# Altium PCB asar_feather.PcbDoc (part 3 of 5)
Units mm, origin at the board's own origin, x right, y up, seen from the top; angles counter-clockwise.
Board outline 50.8 x 22.86 mm, 6 copper layers (Top Layer, L2-GND, L3-SIG, L4-SIG, L5-VCC3V3, Bottom Layer), stack 1.568 mm thick; 181 components, 156 nets, 840 pads, 1779 vias.
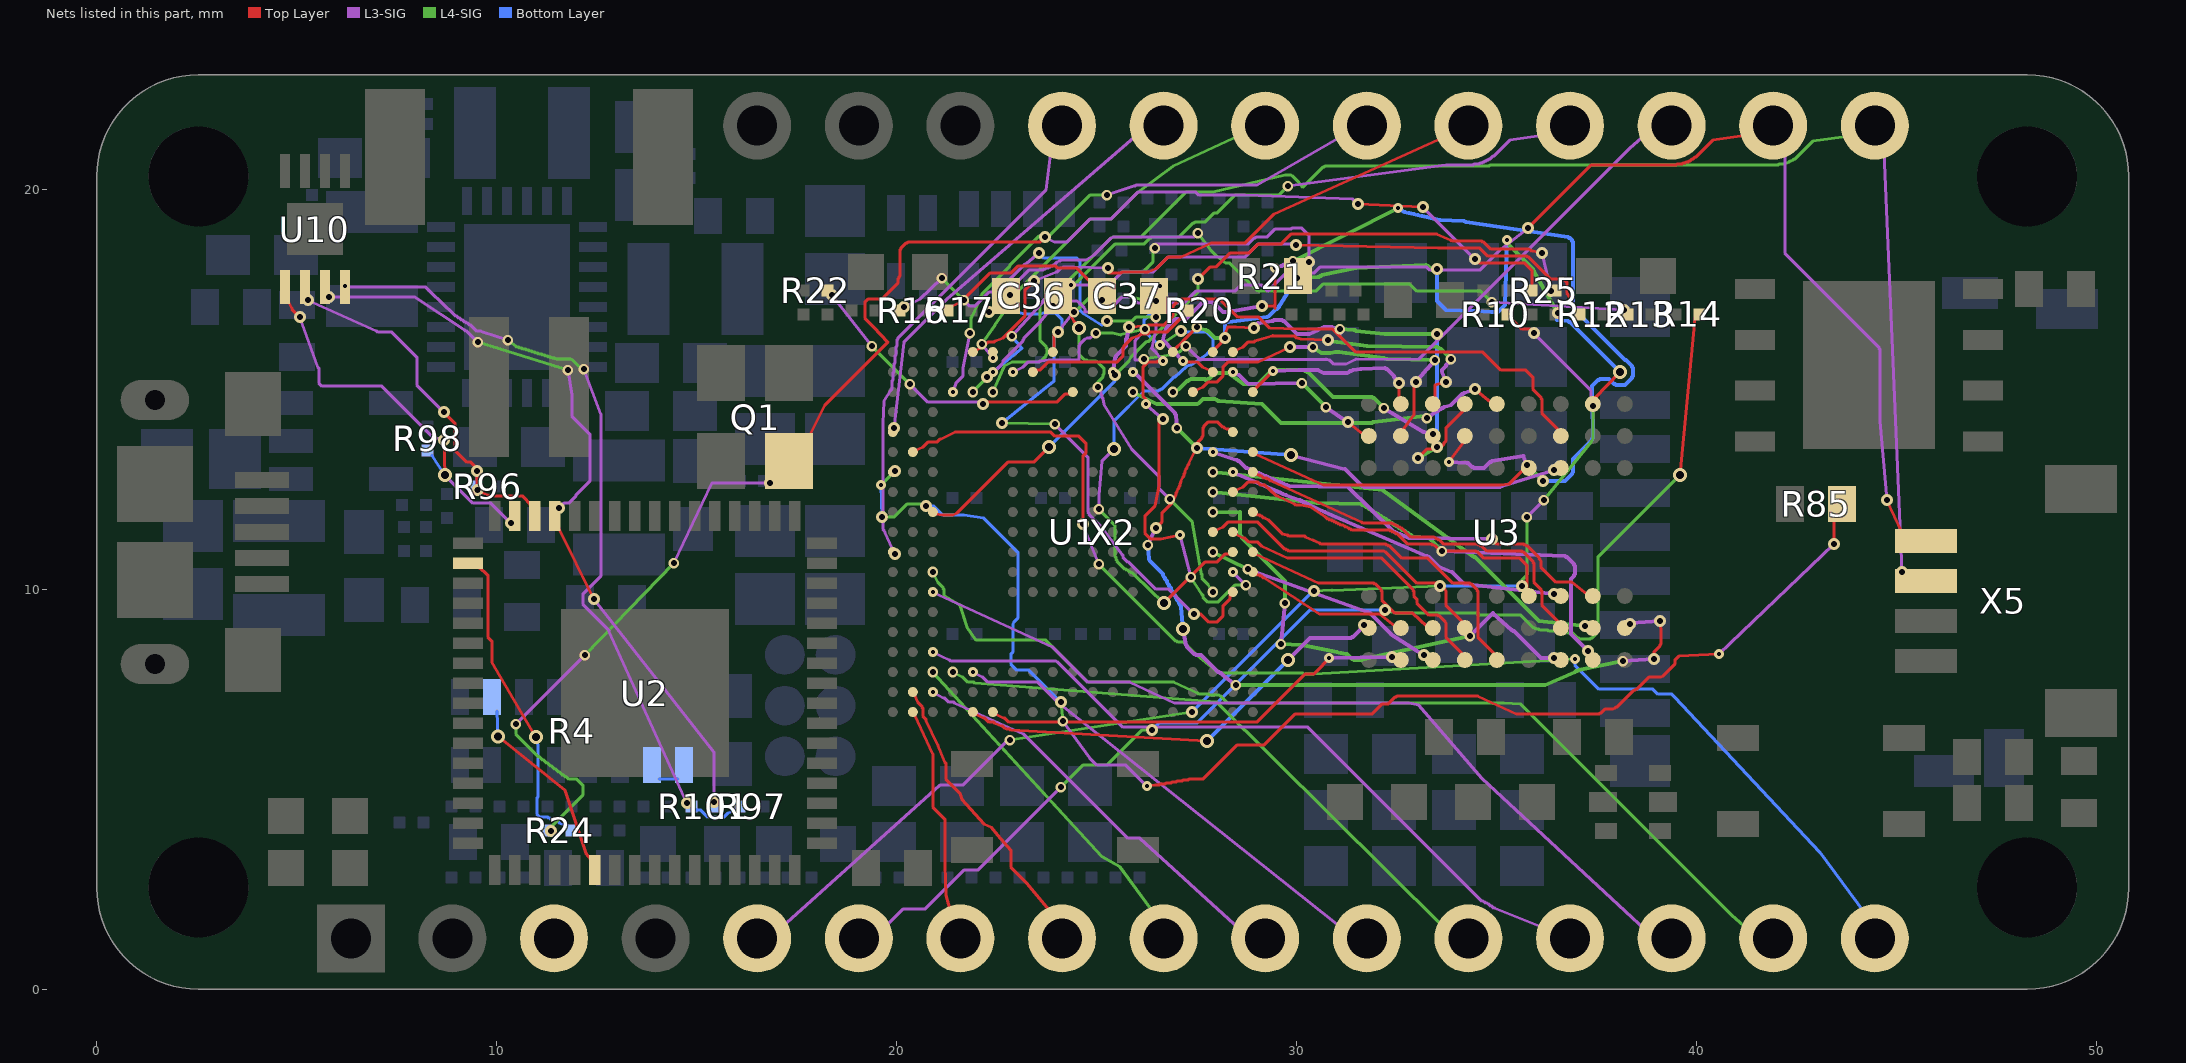
[diagram p6: the nets of this part, all layers, seen from the top]

## Via types
v1: diameter 0.27, hole 0.15, L3-SIG to L4-SIG, tented both sides, 307 vias
v2: diameter 0.3, hole 0.15, L5-VCC3V3 to Bottom Layer, tented both sides, 286 vias
v3: diameter 0.3, hole 0.15, L4-SIG to L5-VCC3V3, tented both sides, 241 vias
v4: diameter 0.3, hole 0.15, Top Layer to L2-GND, tented both sides, 219 vias
v5: diameter 0.3, hole 0.15, L2-GND to L3-SIG, tented both sides, 201 vias
v6: diameter 0.25, hole 0.1, Top Layer to L2-GND, tented both sides, 177 vias
v7: diameter 0.25, hole 0.1, L2-GND to L3-SIG, tented both sides, 125 vias
v8: diameter 0.35, hole 0.2, Top Layer to Bottom Layer, tented both sides, 109 vias
v9: diameter 0.25, hole 0.1, L4-SIG to L5-VCC3V3, tented both sides, 64 vias
v10: diameter 0.25, hole 0.1, L5-VCC3V3 to Bottom Layer, tented both sides, 46 vias
v11: diameter 0.3, hole 0.15, L3-SIG to L4-SIG, tented both sides, 4 vias

## Nets (pads, with @x,y where several pads share a name; then routed paths per layer and width w, separated by ;. In a path a pad name is that pad's centre, name@x,y a point inside that pad or via, vN(x,y) a via of type N, cw(c..) or ccw(c..) an arc to the next point about the centre after c; other vN are vias at no path point) (continued)
A5: U1.R2 U3.J2 | length 21.1
  Top Layer w0.076: v4(26.475,11.525) 26.625,11.675 26.625,11.9 26.875,12.15 26.875,12.175 26.9,12.2 26.9,12.225 26.925,12.25 26.925,12.275 26.95,12.3 26.95,12.325 26.975,12.35 26.975,12.4 27,12.425 27,12.45 27.025,12.5 27.05,12.525 27.05,12.55 27.065,12.581 ; 27.075,12.575 27.075,12.625 27.1,12.7 27.15,12.8 27.175,12.825 27.175,12.875 27.2,12.9 27.2,12.95 27.225,13 27.25,13.025 27.25,13.05 27.275,13.1 27.3,13.125 27.3,13.15 27.35,13.25 27.45,13.45 27.475,13.475 27.475,13.5 ; 27.475,13.499 27.475,13.575 27.5,13.6 27.5,13.625 27.525,13.65 27.525,13.675 27.625,13.775 27.625,13.8 27.65,13.825 27.65,14.025 27.675,14.05 27.675,14.075 27.775,14.175 28.025,14.175 28.15,14.05 28.175,14.05 28.2,14.025 28.25,14 28.3,14 U1.R2@28.325,13.975 ; v4(38.925,8.25) 38.925,8.425 39.075,8.575 39.075,8.6 39.1,8.625 39.1,8.975 v4(39.075,9.2)
  L3-SIG w0.1: v9(26.275,11.1) v4(26.475,11.525) ; v8(27.15,9) 27.225,8.6 27.25,8.575 27.25,8.55 27.425,8.375 27.45,8.375 27.475,8.35 27.6,8.35 28.025,7.925 28.05,7.925 28.075,7.9 28.1,7.9 28.125,7.875 v1(28.475,7.6) ; v1(38.15,8.2) v4(38.925,8.25) ; v4(38.325,9.125) 38.35,9.15 v4(39.075,9.2)
  L4-SIG w0.1: v1(28.475,7.6) 36.2,7.6 36.95,7.925 36.975,7.95 37,7.95 37.05,7.975 v1(38.15,8.2)
  Bottom Layer w0.1: v9(26.275,11.1) 26.3,10.75 26.325,10.7 26.65,10.375 26.65,10.35 26.675,10.3 26.7,10.275 26.7,10.25 26.75,10.2 26.75,10.175 26.775,10.125 26.8,10.1 26.8,10.075 26.85,10.025 26.85,10 26.875,9.95 26.9,9.925 26.9,9.9 26.95,9.85 26.95,9.825 26.975,9.8 26.975,9.775 27,9.75 27,9.725 27.05,9.675 27.05,9.65 27.075,9.6 27.1,9.575 27.1,9.55 v8(27.15,9)
  other v1: 26.275,11.1
  other v5: 38.925,8.25 38.325,9.125 39.075,9.2 26.475,11.525
  other v10: 26.275,11.1
A6: U1.P3 U3.H3 | length 10.8
  Top Layer w0.076: v4(34.875,11.25) 35,11.125 35.675,11.125 35.7,11.1 35.725,11.1 35.75,11.075 35.775,11.075 36.05,10.8 36.05,10.775 36.075,10.75 36.1,10.7 36.1,10.55 36.475,10.175 36.875,10.175 U3.H3@37.25,9.875
  L3-SIG w0.1: v7@27.9,13.425 28.5,13.225 28.525,13.2 28.55,13.2 28.725,13.025 28.75,13.025 28.825,13 28.85,12.975 28.875,12.975 28.9,12.95 28.925,12.95 28.95,12.925 28.975,12.925 29,12.9 29.05,12.9 29.075,12.875 29.1,12.875 29.125,12.85 29.15,12.85 29.225,12.825 29.25,12.8 29.275,12.8 29.3,12.775 29.325,12.775 29.35,12.75 29.4,12.75 29.45,12.725 29.5,12.7 29.575,12.675 29.6,12.65 29.625,12.65 29.65,12.625 29.675,12.625 29.7,12.6 29.75,12.6 29.8,12.575 31.275,12.55 32.4,11.45 32.45,11.425 32.475,11.4 32.5,11.4 32.575,11.375 32.6,11.35 32.625,11.35 32.65,11.325 32.675,11.325 32.75,11.3 32.8,11.275 v4(34.875,11.25)
  other v5: 34.875,11.25
  other v6: 27.9,13.43
  other v7: 27.9,13.43
A7: U1.N3 U3.H2 | length 10.6
  Top Layer w0.076: v4(37.2,9.075) U3.H2@37.25,9.075
  L4-SIG w0.1: v1@27.9,12.925 32.15,12.475 34.4,10.825 34.425,10.8 34.45,10.8 36.05,9.2 v4(37.2,9.075)
  other v1: 37.2,9.075 27.9,12.93
  other v5: 37.2,9.075
  other v6: 27.9,12.93
  other v7: 27.9,12.93
A8: U1.M3 U3.H1 | length 12.1
  Top Layer w0.076: v4(37.275,8.45) U3.H1@37.35,8.375
  L3-SIG w0.1: v1(33.625,10.95) 36.7,10.825 36.725,10.8 36.75,10.8 36.925,10.625 36.925,10.6 36.95,10.575 36.95,10.375 36.925,10.35 36.925,10.325 36.85,10.25 36.85,8.875 v4(37.275,8.45)
  L4-SIG w0.1: v1@27.9,12.425 30.5,12.15 31.6,12.125 31.625,12.1 31.65,12.1 31.7,12.075 31.725,12.05 31.75,12.05 31.8,12 31.825,12 31.875,11.95 31.9,11.95 31.95,11.9 31.975,11.9 32,11.875 32.025,11.875 32.075,11.825 32.1,11.825 32.15,11.775 32.175,11.775 32.2,11.75 32.225,11.75 32.275,11.7 32.3,11.7 32.35,11.65 32.375,11.65 32.425,11.6 32.45,11.6 32.475,11.575 32.5,11.575 32.55,11.525 32.575,11.525 32.625,11.475 32.65,11.475 32.7,11.45 32.75,11.4 32.775,11.4 32.825,11.35 32.85,11.35 32.9,11.3 32.925,11.3 33.3,11.275 v1(33.625,10.95)
  other v1: 27.9,12.43
  other v5: 37.275,8.45
  other v6: 27.9,12.43
  other v7: 27.9,12.43
A9: U1.N2 U3.G3 | length 8.8
  Top Layer w0.076: v4(36.425,9.875) U3.G3@36.45,9.875
  L3-SIG w0.1: v7@28.4,12.925 29.606,12.403 ; 29.6,12.4 29.65,12.375 29.725,12.35 30.075,12.225 30.1,12.2 30.125,12.2 30.15,12.175 30.175,12.175 30.2,12.15 30.225,12.15 30.25,12.125 30.275,12.125 30.7,11.925 ; 30.709,11.925 33.25,10.825 33.275,10.8 33.3,10.8 33.525,10.575 33.875,10.425 34.15,10.15 34.2,10.125 v4(36.425,9.875)
  other v5: 36.425,9.875
  other v6: 28.4,12.93
  other v7: 28.4,12.93
A10: U1.W5 U3.H9 | length 17.6
  Top Layer w0.076: U1.W5@26.95,16 27.143,16.193 ; 27.15,16.2 v1(27.5,16.55) ; U3.H9@37.45,14.775 v8(38.075,15.425)
  L4-SIG w0.1: v1(27.5,16.55) 27.725,16.475 27.75,16.45 27.775,16.45 27.95,16.275 v3(28.2,16.275) ; v3(30,17.775) 30.525,17.8 30.55,17.8 30.575,17.825 30.6,17.825 30.625,17.85 31.475,18.025 33.225,18.1 33.25,18.075 33.275,18.075 33.35,18 v3(33.5,18) ; v9(35.25,18.725) 35.25,18.65 35.9,18 35.9,17.975 35.925,17.95 v3(36.525,16.9)
  Bottom Layer w0.1: v3(28.2,16.275) 28.2,16.675 ; 28.2,16.671 29.25,16.8 29.3,16.825 29.475,17 29.5,17 29.55,17.05 29.55,17.075 29.575,17.1 v3(30,17.775) ; v3(33.5,18) 33.5,17.2 33.725,16.975 34.45,16.95 34.872,16.929 ; 34.875,16.925 35.025,16.925 35.2,17.1 v9(35.25,18.725) ; 36.508,16.726 36.775,16.7 36.8,16.675 36.825,16.675 v8(38.075,15.425) ; 36.525,16.725 v3(36.525,16.9)
  other v2: 28.2,16.275 36.525,16.9 30,17.775 33.5,18
  other v6: 27.5,16.55
  other v7: 27.5,16.55
  other v10: 35.25,18.725
A11: U1.N1 U3.G2 | length 9.4
  Top Layer w0.076: U1.N1@28.975,12.875 29,12.875 29.025,12.85 29.075,12.85 29.1,12.825 29.125,12.825 29.175,12.775 29.25,12.775 29.275,12.75 29.3,12.75 29.35,12.7 29.375,12.7 31.625,11.675 31.65,11.65 32.375,11.65 32.4,11.625 32.425,11.625 32.45,11.6 32.475,11.6 32.5,11.575 32.525,11.575 32.55,11.55 32.575,11.55 32.6,11.525 32.625,11.525 32.85,11.3 33.425,11.3 33.475,11.275 33.5,11.25 33.525,11.25 33.55,11.225 33.575,11.225 33.675,11.125 34.525,11.125 34.55,11.1 34.575,11.1 34.6,11.075 34.625,11.075 34.75,10.95 35.625,10.95 35.65,10.925 35.675,10.925 35.9,10.7 35.9,10.675 35.925,10.65 35.925,10.175 36.1,10 36.1,9.975 36.125,9.95 36.125,9.6 U3.G2@36.55,9.175
A12: U1.L3 U3.G1 | length 12.1
  Top Layer w0.076: v4(36.425,8.275) U3.G1@36.45,8.275
  L3-SIG w0.1: v1(29.6,8.625) v1(29.7,9.65) ; v1(34.325,8.825) 34.9,9.4 35.375,8.975 35.4,8.95 35.425,8.95 36.1,8.275 v4(36.425,8.275)
  L4-SIG w0.1: v1@27.9,11.925 28.575,11.92 ; 28.575,11.925 28.575,11.4 28.6,11.325 28.625,11.3 28.625,11.275 29.7,10.2 v1(29.7,9.65) ; v1(29.6,8.625) 30.125,8.6 30.25,8.575 30.375,8.55 30.5,8.525 30.625,8.5 30.75,8.475 30.875,8.45 31,8.425 31.1,8.4 31.225,8.375 31.25,8.375 31.375,8.25 31.4,8.25 31.425,8.225 31.625,8.225 31.65,8.25 31.675,8.25 v1(34.325,8.825)
  other v1: 27.9,11.93
  other v5: 36.425,8.275
  other v6: 27.9,11.93
  other v7: 27.9,11.93
AIN15_N: C36.1 R13.1 U1.G2 | length 32
  Top Layer w0.076: v4(27.425,9.375) 27.6,9.375 27.8,9.175 28,9.175 28.15,9.325 28.15,9.575 28.325,9.75 28.325,9.825 U1.G2@28.35,9.85
  L3-SIG w0.076: v3(22.3,16.925) 23.15,17.825 23.3,17.975 23.65,17.975 23.675,18 23.7,18 23.725,18.025 23.775,18.025 23.8,18.05 23.825,18.05 23.85,18.075 23.875,18.075 23.9,18.1 23.925,18.1 24,18.175 24.05,18.2 24.075,18.2 24.1,18.225 24.725,18.225 24.925,18.35 24.975,18.4 ; v1(23.95,14.125) 24.775,13.3 24.775,11.925 24.8,11.9 24.8,11.875 25.075,11.6 25.625,10.875 25.65,10.85 25.65,10.8 25.775,10.675 25.8,10.675 26.475,10 26.8,10 v4(27.425,9.375) ; 24.97,18.395 25.35,18.775 25.4,18.8 27.425,18.8 v1(27.525,18.9) ; v1(34.875,17.175) v4(38.175,16.975)
  L4-SIG w0.076: v3(22.625,14.15) v1(23.95,14.125) ; v1(27.525,18.9) 27.85,18.475 28,18.325 28.225,18.15 28.325,18.15 29.025,17.45 30.475,17.45 30.65,17.625 32.825,17.625 33,17.45 34.6,17.45 v1(34.875,17.175)
  Bottom Layer w0.076: v3(22.3,16.925) 23,16.925 23.2,16.875 23.61,16.875 ; v3(22.625,14.15) 23.925,15.2 ; 23.6,16.875 23.65,16.9 23.975,16.9 24.125,16.75 24.125,16.5 23.925,16.3 23.925,16 ; 23.925,15.191 23.925,16.007
  other v1: 22.3,16.925
  other v2: 22.625,14.15 22.3,16.925
  other v4: 22.825,17.35
  other v5: 27.425,9.375 38.175,16.975 22.825,17.35
AIN15_P: C36.2 R12.1 U1.G3 | length 22.6
  Top Layer w0.076: C36.2@24.3,16.975 24.425,16.7 24.575,16.55 v8(24.55,16.525) ; C36.2@24.3,17.6 v6(24.35,17.6) ; v4(29.975,18.6) 33.525,18.525 34.575,18.525 34.775,18.325 35.75,18.325 35.775,18.3 35.8,18.3 36.35,17.75 36.675,17.75 36.75,17.675 36.75,17.4 36.775,17.375 R12.1@36.95,16.975
  L3-SIG w0.076: v6(24.35,17.6) 25.3,17.6 25.625,17.925 26.4,17.925 26.775,18.3 28.7,18.3 29.025,18.625 29.95,18.625 v4(29.975,18.6) ; v1(25.025,15.05) 25.1,14.975 25.1,14.875 25.125,14.85 25.125,14.8 25.15,14.775 25.15,14.75 25.175,14.625 25.875,13.5 26.55,12.825 26.55,12.525 v1(26.825,12.25)
  L4-SIG w0.076: v8(24.55,16.525) 24.55,15.875 24.7,15.725 24.75,15.725 24.775,15.7 24.975,15.7 25.025,15.675 25.175,15.525 ; v1(25.025,15.05) 25.025,15.175 25.15,15.3 25.15,15.35 25.175,15.375 25.175,15.52 ; v1(26.825,12.25) 27.375,11.7 27.6,10.425 27.6,10.4 27.625,10.375 27.625,10.275 27.775,10.125 v1@27.9,9.925
  other v1: 27.9,9.93
  other v5: 29.975,18.6
  other v6: 27.9,9.93
  other v7: 27.9,9.93 24.35,17.6
AIN16_N: C37.1 R17.1 U1.J2 | length 20.3
  Top Layer w0.076: R17.1@21.375,17.075 21.6,17.175 22.325,17.9 22.85,17.9 23.025,18.075 23.975,18.075 24.025,18.025 24.5,18.025 C37.1@24.85,17.675 ; v8(26.675,9.65) 27.7,10.675 28,10.675 28.2,10.875 U1.J2@28.325,10.875
  L3-SIG w0.076: v1(25.05,12) 25.05,12.35 25.125,13.2 v8(25.425,13.5)
  L4-SIG w0.076: v1(25.05,12) 25.45,11.6 25.45,10.825 25.475,10.8 25.475,10.75 25.5,10.725 25.5,10.7 25.7,10.5 25.725,10.5 25.75,10.475 25.775,10.475 25.825,10.425 25.85,10.425 25.875,10.4 25.9,10.4 25.95,10.35 v8(26.675,9.65) ; v1(25.125,17.225) 25.317,17.017 ; 25.325,17.025 25.6,17.3 25.875,17.3 26.275,17.2 ; 26.287,17.19 v9(26.575,17.575) ; v9(26.575,16.1) v3(27.1,16.45)
  Bottom Layer w0.076: v8(25.425,13.5) 25.425,14.2 26.182,14.957 ; 26.175,14.95 26.525,14.95 26.55,14.975 26.575,14.975 26.6,15 26.625,15 26.925,15.3 26.95,15.3 27.25,15.575 27.35,15.6 27.75,15.875 27.9,16.025 27.9,16.275 27.75,16.425 27.125,16.425 v3(27.1,16.45) ; v10@26.575,16.075 v9(26.575,16.1) ; v9(26.575,17.575) 26.55,17.55 26.55,17.075 26.475,17 26.45,17 26.175,16.725 26.175,16.55 26.175,16.475 v10@26.603,16.047
  other v2: 27.1,16.45
  other v4: 25.125,17.225
  other v5: 25.125,17.225
  other v10: 26.575,16.1 26.575,17.575
AIN16_P: C37.2 R16.1 U1.H2 | length 20
  Top Layer w0.076: 26.15,15.3 26.15,15.55 26.275,15.675 26.5,15.675 26.525,15.7 v6(26.65,15.7) ; 26.15,15.303 26.15,14.825 26.225,14.75 v6(26.225,14.625) ; v4(26.65,14.25) 26.55,14.15 26.55,12.575 26.45,12.075 26.2,11.825 26.2,11.4 26.35,11.25 26.6,11.25 v6(27.075,11.35)
  L3-SIG w0.076: v4(20.175,17.05) 20.575,17.25 v1(21.125,17.775) ; v1(21.675,17.225) 21.825,17.075 21.94,17.075 ; 21.95,17.075 22.3,17.425 22.5,17.425 23.2,18.125 23.25,18.15 v3(23.55,18.4) ; v6(26.225,14.625) v4(26.65,14.25) ; 26.365,16.035 26.45,15.95 v6(26.65,15.7) ; 26.375,16.025 26.45,16.375 26.45,16.4 26.475,16.425 v1(26.475,16.8) v4(26.475,17.2) ; v6(27.075,11.35) v1(27.35,10.3) ; v7@28.4,10.425 v1(28.725,10.1)
  L4-SIG w0.076: v1(21.125,17.775) v1(21.675,17.225) ; v3(25.25,16.7) 25.6,16.7 25.875,16.7 25.975,16.8 v1(26.475,16.8) ; v1(27.35,10.3) 27.625,9.875 27.65,9.85 27.65,9.8 27.775,9.675 28.025,9.675 28.45,10.1 v1(28.725,10.1)
  Bottom Layer w0.076: v3(23.55,18.4) 23.675,18.275 24.5,18.275 24.575,18.2 24.575,16.975 24.654,16.896 ; 24.65,16.9 25.125,16.6 25.225,16.675 v3(25.25,16.7)
  other v1: 23.55,18.4
  other v2: 25.25,16.7 23.55,18.4
  other v5: 26.65,14.25 20.175,17.05 26.475,17.2
  other v6: 28.4,10.43
  other v7: 28.4,10.43 27.075,11.35 26.225,14.625 26.65,15.7
ANALOG-IO0: R10.2 X2.5 | length 29.9
  Top Layer w0.076: R10.2@35.375,16.775 35.4,16.725 35.625,16.5 35.825,16.5 v4(35.925,16.4)
  L3-SIG w0.076: X2.5@17.125,1.55 21.075,5.1 21.65,5.1 22.775,6.225 v1(22.825,6.225) ; v1(35.75,11.8) v1(36.175,12.225) ; v4(35.925,16.4) 37.325,15 37.35,14.95 37.35,14.625 v1(37.4,14.575)
  L4-SIG w0.076: v1(22.825,6.225) v3(27.375,6.925) ; v3(30.425,9.95) 30.875,9.975 ; 30.877,9.969 v3(33.575,10.075) ; v3(35.625,10.075) 35.625,10.225 35.75,10.35 v1(35.75,11.8) ; v1(36.175,12.225) 37.375,13.7 37.4,13.75 v1(37.4,14.575)
  Bottom Layer w0.076: v3(27.375,6.925) 30.4,9.95 v3(30.425,9.95) ; v3(33.575,10.075) v3(35.625,10.075)
  other v2: 27.375,6.925 30.425,9.95 33.575,10.075 35.625,10.075
  other v5: 35.925,16.4
ANALOG-IO1: R14.2 X2.6 | length 30.2
  Top Layer w0.076: v8(39.575,12.85) R14.2@39.95,16.775
  L3-SIG w0.076: X2.6@19.675,1.525 20.15,2 20.7,2 21.675,2.975 22.025,2.975 v1(24.1,5.05)
  L4-SIG w0.076: v1(24.1,5.05) 24.65,5.6 25.25,5.6 26.125,6.475 v3(26.375,6.475) ; v3(32.2,9.475) 32.45,9.4 34.5,9.4 34.525,9.375 34.55,9.375 34.575,9.35 35.6,9.35 35.925,9.025 35.95,9.025 35.975,9 36.05,9 36.075,8.975 36.275,8.975 36.3,8.95 36.5,8.95 36.525,8.925 36.75,8.925 36.775,8.9 36.9,8.9 37.025,8.775 37.05,8.775 37.075,8.75 37.325,8.75 37.35,8.775 37.375,8.775 37.5,8.9 37.5,8.925 37.525,8.95 37.525,10.8 v8(39.575,12.85)
  Bottom Layer w0.076: v3(26.375,6.475) 26.55,6.65 27.5,6.65 30.325,9.475 v3(32.2,9.475)
  other v2: 26.375,6.475 32.2,9.475
AREF: X2.3
BS0: U1.V7 U3.G7 | length 11.8
  Top Layer w0.076: v4(36.425,12.975) U3.G7@36.45,12.975
  L3-SIG w0.1: v7@25.9,15.425 25.975,15.375 26.95,14.4 26.95,14.375 26.975,14.35 v1(27,14.025) ; v8(29.85,13.35) 31.2,13 31.625,12.575 31.65,12.575 31.675,12.55 35.075,12.55 35.1,12.575 35.125,12.575 v4(36.425,12.975)
  L4-SIG w0.1: v1(27,14.025) v3(27.5,13.525)
  Bottom Layer w0.1: v3(27.5,13.525) v8(29.85,13.35)
  other v2: 27.5,13.525
  other v5: 36.425,12.975
  other v6: 25.9,15.43
  other v7: 25.9,15.43
BS1: U1.V8 U3.G8 | length 14.2
  Top Layer w0.076: v4(25.8,16.55) 26.225,16.575 26.25,16.575 26.275,16.6 26.675,16.6 ; 26.67,16.595 26.9,16.825 26.9,17.075 27.075,17.25 28.075,17.25 28.525,16.8 29.05,16.8 29.325,16.525 30.025,16.5 30.9,16.5 31.475,15.925 34.65,15.925 35.1,15.475 35.725,15.475 35.9,15.3 35.9,15 36.1,14.8 36.1,14.775 36.125,14.75 36.125,14.4 U3.G8@36.55,13.975
  L3-SIG w0.1: v7@25.4,15.425 25.45,15.775 25.475,15.8 25.475,15.825 25.725,16.075 25.725,16.25 25.75,16.275 25.75,16.3 v4(25.8,16.55)
  other v5: 25.8,16.55
  other v6: 25.4,15.43
  other v7: 25.4,15.43
BTN: R85.2 U1.N19 | length 33.8
  Top Layer w0.076: v6(26.25,5.075) 26.45,5.1 26.55,5.1 26.575,5.125 26.7,5.125 26.725,5.15 26.85,5.15 26.875,5.175 26.975,5.175 27,5.2 27.125,5.2 27.15,5.225 27.275,5.225 27.3,5.25 27.65,5.25 28.5,6.1 29.175,6.1 29.95,6.875 31.875,6.875 32.125,7.125 32.275,7.125 32.45,7.3 32.475,7.3 32.5,7.325 34.525,7.325 35.5,6.875 37.55,6.875 37.575,6.9 37.6,6.9 37.7,7 37.9,7 37.95,7.025 37.975,7.05 38,7.05 38.425,7.475 38.45,7.475 38.475,7.5 38.5,7.5 38.8,7.8 39.1,7.8 39.15,7.825 39.45,8.125 39.45,8.225 39.55,8.325 v6(40.55,8.375) ; v4(43.425,11.125) R85.2@43.425,11.775
  L3-SIG w0.076: v1(24.15,6.7) 24.825,5.775 25,5.6 25.725,5.6 v6(26.25,5.075) ; v6(40.55,8.375) v4(43.425,11.125)
  L4-SIG w0.076: v9(19.6,12.6) v4(19.95,12.95) ; v3(19.625,11.8) 19.925,11.8 20.25,12.125 20.675,12.125 v3(20.725,12.075) ; v3(24.1,7.175) v1(24.15,6.7)
  Bottom Layer w0.076: v9(19.6,12.6) v3(19.625,11.8) ; v3(20.725,12.075) 20.925,12.075 21.15,11.85 21.675,11.85 22.175,11.775 23.025,10.925 23.025,9.275 22.925,9.175 22.9,9.125 22.9,8.425 22.85,8.375 22.85,8.125 23,7.975 23.3,7.975 v3(24.1,7.175)
  other v1: 19.95,12.95
  other v2: 24.1,7.175 19.625,11.8 20.725,12.075
  other v5: 43.425,11.125 19.95,12.95
  other v7: 26.25,5.075 40.55,8.375
  other v10: 19.6,12.6
CAS#: U1.P1 U3.F7 | length 7
  Top Layer w0.076: U1.P1@28.975,13.375 30.675,12.6 35.1,12.6 35.3,12.625 U3.F7@35.65,12.975
CFG-M0: R20.1 U1.V12 | length 4.4
  Top Layer w0.076: U1.V12@23.475,15.475 23.575,15.475 23.775,15.675 25.5,15.675 25.65,15.825 25.65,16.025 25.675,16.05 25.675,16.075 25.875,16.275 26.075,16.35 26.1,16.375 26.275,16.375 26.325,16.425 26.75,16.425 27.15,16.825 R20.1@27.15,16.85
CFG-M1: R21.2 U1.W11 | length 8.8
  Top Layer w0.076: U1.W11@23.925,16.025 23.925,16.375 v4(24.025,16.425)
  L3-SIG w0.076: v4(24.025,16.425) v1(24.425,16.925) ; v1(26.45,18.525) 26.45,18.625 28.775,18.625 28.925,18.775 28.95,18.775 28.975,18.8 29.25,18.8 29.45,19 29.85,19 29.875,19.025 30.125,19.025 30.3,18.85 v4(30.3,18.175)
  L4-SIG w0.076: v1(24.425,16.925) v1@24.5,16.975 ; v1@24.51,16.985 25,17.475 25.05,17.5 25.2,17.5 25.625,17.925 26.15,17.925 26.4,18.175 26.4,18.475 v1(26.45,18.525)
  other v5: 24.025,16.425 30.3,18.175
CFG-M2: R22.2 U1.U10 | length 7.3
  Top Layer w0.076: v4(22.15,14.625) 22.2,14.675 24,14.675 24.2,14.875 U1.U10@24.325,14.875
  L3-SIG w0.076: v4(18.375,17.35) v1(19.375,16.075) ; v1(20.325,15.125) 20.775,14.675 22.1,14.675 v4(22.15,14.625)
  L4-SIG w0.076: v1(19.375,16.075) v1(20.325,15.125)
  other v5: 22.15,14.625 18.375,17.35
CHAN0: U1.A18 X2.7 | length 5.2
  Top Layer w0.076: U1.A18@20.45,6.85 20.9,5.875 20.9,4.55 21.2,4.25 21.2,3.1 21.225,2.35 X2.7@21.35,1.9
CHAN1: U1.B18 X2.8 | length 6.7
  Top Layer w0.076: U1.B18@20.45,7.35 20.525,7.175 20.625,7.075 20.625,7.05 20.65,7.025 20.65,6.825 20.725,6.75 20.725,6.725 21.025,6.1 21.2,5.675 21.225,5.65 21.225,5.25 21.575,4.9 21.625,4.75 22.187,4.125 22.363,4.048 22.525,3.85 22.85,3.475 22.85,3.05 23.25,2.65 X2.8@23.875,1.9
CHAN2: U1.C17 X2.9 | length 8.2
  L4-SIG w0.076: v1@20.9,7.925 25.124,3.319 25.58,3.058 X2.9@26.425,1.9
  other v1: 20.9,7.93
  other v6: 20.9,7.93
  other v7: 20.9,7.93
CHAN3: U1.B17 X2.10 | length 9.9
  L3-SIG w0.076: v7@20.9,7.425 21.175,7.275 21.2,7.275 21.3,7.175 21.425,7.175 21.45,7.15 23.175,6.375 25.775,3.775 26.075,3.775 X2.10@28.575,1.5
  other v6: 20.9,7.43
  other v7: 20.9,7.43
CHAN4: U1.C15 X2.11 | length 11.5
  L3-SIG w0.076: v7@21.9,7.925 22.15,7.8 22.275,7.675 23.525,7.675 24.05,7.15 X2.11@31.125,1.525
  other v6: 21.9,7.93
  other v7: 21.9,7.93
CHAN5: U1.C16 X2.12 | length 14.7
  L4-SIG w0.076: v1@21.4,7.925 21.65,7.8 21.775,7.675 21.925,7.675 21.95,7.65 28,7.175 X2.12@33.675,1.55
  other v1: 21.4,7.93
  other v6: 21.4,7.93
  other v7: 21.4,7.93
CHAN6: U1.D17 X2.13 | length 18
  L3-SIG w0.076: v7@20.9,8.425 21.325,8.225 21.35,8.2 23.975,8.2 24.025,8.175 25.65,6.55 30.275,6.55 34.625,2.2 34.65,2.2 34.7,2.175 34.725,2.15 34.75,2.15 34.8,2.125 34.85,2.075 34.875,2.075 34.925,2.025 34.95,2.025 X2.13@36.2,1.525
  other v6: 20.9,8.43
  other v7: 20.9,8.43
CHAN7: U1.G17 X2.14 | length 20.9
  L3-SIG w0.076: v7@20.9,9.925 23.9,8.55 24.775,7.675 25.825,7.675 26.95,7.15 32.8,7.15 33.05,7.1 34.625,5.275 X2.14@38.725,1.475
  other v6: 20.9,9.93
  other v7: 20.9,9.93
CHAN8: U1.H17 X2.15 | length 24.3
  L4-SIG w0.076: v1@20.9,10.425 21.025,10.175 21.15,10.05 21.15,10.025 21.175,10 21.175,9.85 21.575,9.6 21.75,9.055 21.975,8.725 23.725,8.725 24.775,7.675 26.925,7.675 27.525,7.4 27.55,7.375 27.8,7.375 27.825,7.35 28.05,7.35 28.1,7.325 28.275,7.15 35.175,7.15 35.6,7.125 40.875,1.85 X2.15@41.275,1.5
  other v1: 20.9,10.43
  other v6: 20.9,10.43
  other v7: 20.9,10.43
CHAN14: U1.J19 X2.20 | length 11.8
  L3-SIG w0.076: v4(19.95,10.875) 19.7,11.425 19.675,11.475 19.65,11.5 19.65,14.15 19.675,14.7 19.85,14.975 19.875,15 19.875,15.2 19.9,15.225 19.9,15.4 19.925,15.425 19.925,15.625 19.95,15.65 19.95,15.825 19.975,15.85 19.975,16.05 20,16.075 20,16.225 20.025,16.25 20.025,16.275 23.725,19.975 X2.20@23.85,20.975
  other v5: 19.95,10.875
CHAN15: U1.R19 X2.21 | length 10
  L3-SIG w0.076: v4(19.925,14.025) 20.175,16.175 21.25,17.25 X2.21@26.025,21.375
  other v5: 19.925,14.025
CHAN16: U1.W14 X2.22 | length 9.1
  Top Layer w0.076: v6(22.4,15.775) U1.W14@22.4,15.85
  L3-SIG w0.076: v1(22.125,16.125) v6(22.4,15.775)
  L4-SIG w0.076: v1(22.125,16.125) 22.455,16.598 ; 22.45,16.6 22.875,17.2 ; 22.869,17.194 23.1,17.525 24.825,19.25 25.35,19.25 26.025,19.925 26.9,20.575 X2.22@28.575,21.35
  other v7: 22.4,15.775
CHAN17: U1.U16 X2.23 | length 13.1
  L3-SIG w0.076: v7@21.4,14.925 21.475,15.15 21.65,15.325 21.65,15.525 v1(21.825,16.4) ; v1(25.25,19.85) 25.925,20.075 25.95,20.075 25.975,20.1 29,20.1 X2.23@31.125,21.325
  L4-SIG w0.076: v1(21.825,16.4) 21.85,16.425 21.85,16.775 21.875,16.8 21.875,16.825 21.903,16.853 ; 21.9,16.85 22,17.075 22.1,17.25 ; 22.1,17.246 22.1,17.325 22.125,17.35 22.125,17.375 22.825,18.075 22.825,18.1 23.55,18.825 23.575,18.825 23.6,18.85 23.825,18.85 24.825,19.85 v1(25.25,19.85)
  other v6: 21.4,14.93
  other v7: 21.4,14.93
CHAN18: U1.W15 X2.24 | length 13.9
  Top Layer w0.076: U1.W15@21.975,15.975 22.15,16.05 22.275,16.175 22.425,16.175 22.45,16.2 22.65,16.275 23.2,16.825 23.2,17.475 v4(23.425,17.7) ; v4(25.275,18.025) 25.275,17.9 25.6,17.9 25.625,17.925 26.275,17.925 26.5,18.025 26.775,18.3 27.1,18.3 27.85,18.65 28.7,18.65 29.425,19.375 X2.24@33.675,21.3
  L3-SIG w0.076: v4(23.425,17.7) 23.975,17.925 24,17.925 24.1,18.025 24.15,18.05 24.425,18.05 v4(25.275,18.025)
  other v5: 23.425,17.7 25.275,18.025
CHAN19: U1.V14 X2.25 | length 16.1
  L3-SIG w0.076: v7@22.4,15.425 22.475,15.475 22.625,15.625 22.65,15.675 22.65,15.7 23.15,16.2 23.15,16.225 23.175,16.25 23.175,16.275 23.575,16.675 v1(23.9,17.075) ; v1(29.775,20.075) 33.725,20.6 34.4,20.6 34.425,20.625 34.55,20.625 34.575,20.65 34.625,20.65 34.65,20.675 34.675,20.675 34.7,20.7 34.725,20.7 34.75,20.725 34.775,20.725 34.8,20.75 34.825,20.75 34.9,20.825 34.925,20.825 35.325,21.225 X2.25@36.2,21.35
  L4-SIG w0.076: v1(23.9,17.075) 25.45,18.625 26.175,18.625 26.325,18.775 26.35,18.775 26.375,18.8 27.05,18.8 27.4,19.15 27.425,19.15 27.45,19.175 27.7,19.175 27.925,19.4 28,19.4 28.45,19.85 29.55,19.85 v1(29.775,20.075)
  other v6: 22.4,15.43
  other v7: 22.4,15.43
CHAN20: U1.V13 X2.26 | length 20.2
  L3-SIG w0.076: v7@22.9,15.425 23.15,15.55 23.272,15.672 ; 23.275,15.675 23.55,15.675 23.575,15.7 23.6,15.7 23.8,15.725 ; 23.791,15.726 24.55,15.728 ; 24.55,15.725 24.55,16.075 24.575,16.1 24.575,16.125 24.7,16.25 24.75,16.275 24.801,16.275 24.825,16.275 24.85,16.3 v1(24.975,16.4) ; 25.95,15.725 25.95,16.206 ; 25.95,15.731 v1@26.106,15.732 ; 25.95,16.2 v1(26.2,16.5) ; v1@26.1,15.725 v1(26.175,15.75) ; v1(27.225,16.075) 27.6,15.725 ; 27.598,15.736 30.732,15.744 ; 30.725,15.75 30.8,15.725 30.825,15.725 30.925,15.625 31.225,15.625 31.475,15.75 ; 31.469,15.746 33.05,15.75 38.325,21.025 X2.26@38.725,21.375
  L4-SIG w0.076: v1(24.975,16.4) 25.4,16.4 25.6,16.35 ; 25.602,16.362 v1(26.2,16.5) ; v1(26.175,15.75) 27,15.875 v1(27.225,16.075)
  other v6: 22.9,15.43
  other v7: 22.9,15.43
CHAN21: U1.U15 X2.27 X5.4 | length 34.2
  Top Layer w0.076: v4(35.775,19.025) 37.35,20.6 39.475,20.6 39.5,20.625 39.625,20.625 39.65,20.65 39.7,20.65 39.725,20.675 39.775,20.675 39.8,20.7 39.825,20.7 39.875,20.75 39.9,20.75 39.95,20.8 39.975,20.8 40.4,21.225 X2.27@41.275,21.35 ; v4(44.75,12.225) X5.4@45.125,11.425
  L3-SIG w0.076: v1(22.875,16.325) 23.625,17.15 23.65,17.175 23.65,17.2 23.775,17.325 23.8,17.325 23.825,17.35 23.975,17.35 24,17.325 24.025,17.325 24.175,17.175 24.3,17.175 24.35,17.2 24.5,17.2 24.55,17.175 24.675,17.05 24.7,17 24.7,16.925 ; 24.699,16.925 25.25,16.925 25.625,17.3 25.875,17.3 26.025,17.15 26.188,17.15 ; 26.2,17.15 26.2,17.325 26.35,17.475 26.6,17.475 26.75,17.325 26.75,17.275 26.775,17.25 26.8,17.15 ; 26.812,17.15 27.175,17.15 27.475,17.45 28.45,17.45 28.6,17.6 29.125,17.6 29.275,17.45 29.725,17.9 30.425,17.9 30.575,18.05 33.25,18.05 33.325,17.975 34.575,17.975 35.1,18.5 v4(35.775,19.025) ; X2.27@42.2,20.975 42.2,18.4 44.55,16.05 44.55,16.025 44.575,16 44.575,14.2 v4(44.75,12.225)
  L4-SIG w0.076: v1@21.9,14.925 v3(22.25,15.3)
  Bottom Layer w0.076: v3(22.25,15.3) 23.129,16.021 ; v1(22.875,16.325) 23.125,16.025
  other v1: 21.9,14.93
  other v2: 22.25,15.3
  other v5: 44.75,12.225 35.775,19.025
  other v6: 21.9,14.93
  other v7: 21.9,14.93
  other v9: 22.875,16.325
  other v10: 22.875,16.325
CHAN22: U1.U14 X2.28 X5.3 | length 35.8
  L3-SIG w0.076: X2.28@44.675,20.95 v4(45.125,10.425)
  L4-SIG w0.076: v1@22.4,14.925 22.678,15.567 ; 22.675,15.575 22.875,15.675 23.55,15.675 23.575,15.7 23.6,15.7 23.725,15.825 23.725,15.85 23.75,15.875 23.75,16.025 23.725,16.05 23.725,16.075 23.575,16.225 23.575,17.125 23.775,17.325 23.8,17.325 23.825,17.35 23.925,17.35 25.35,18.775 25.4,18.8 26.1,18.8 27.225,19.925 27.9,19.925 29.7,20.35 29.85,20.35 29.9,20.325 30.025,20.2 30.15,20.05 30.65,20.55 30.675,20.55 30.7,20.575 34.8,20.575 34.825,20.6 42.025,20.6 42.05,20.625 42.175,20.625 42.2,20.65 42.25,20.65 42.3,20.675 42.325,20.7 42.35,20.7 42.4,20.725 42.425,20.75 42.45,20.75 42.9,21.2 X2.28@43.825,21.325
  other v1: 22.4,14.93
  other v5: 45.125,10.425
  other v6: 22.4,14.93
  other v7: 22.4,14.93
CHAN-CLK: U1.P18 X2.16 | length 30.8
  Top Layer w0.076: U1.P18@20.475,13.475 20.65,13.55 20.775,13.675 21,13.675 21.075,13.75 21.1,13.75 21.45,13.925 23.85,13.925 23.95,13.825 24.55,13.825 24.725,13.65 24.725,13.4 24.65,13.325 v4(24.65,11.625)
  L3-SIG w0.076: v4(24.65,11.625) v1(25.05,10.625)
  L4-SIG w0.076: v1(25.05,10.625) 26.975,8.7 27,8.7 27.025,8.675 27.175,8.675 27.45,8.4 28,7.95 28.025,7.95 28.05,7.925 28.1,7.9 30.15,7.9 30.175,7.875 30.425,7.875 v9(36.95,8.25)
  Bottom Layer w0.076: v9(36.95,8.25) 36.95,8.1 37.55,7.5 38.9,7.5 39.025,7.375 39.375,7.375 39.45,7.3 43.075,3.425 X2.16@44.2,1.9
  other v5: 24.65,11.625
  other v10: 36.95,8.25
CKE: U1.M2 U3.F3 | length 8.7
  Top Layer w0.076: U1.M2@28.475,12.475 28.65,12.55 28.775,12.675 29.025,12.675 29.1,12.6 29.2,12.6 29.475,12.35 29.5,12.325 29.525,12.325 29.95,12.125 29.975,12.1 30.1,12.1 30.35,12.05 30.725,11.8 ; 30.72,11.79 30.75,11.775 30.775,11.75 30.8,11.75 30.825,11.725 30.875,11.725 30.9,11.7 30.925,11.7 30.95,11.675 30.975,11.675 31,11.65 31.025,11.65 31.05,11.625 31.075,11.625 31.1,11.6 31.15,11.6 31.2,11.575 31.225,11.55 31.25,11.55 31.3,11.525 31.325,11.5 31.35,11.5 31.375,11.475 32.325,11.475 32.35,11.45 32.375,11.45 32.4,11.425 32.425,11.425 32.475,11.4 32.5,11.375 32.525,11.375 32.775,11.125 33.375,11.125 33.4,11.1 33.425,11.1 33.475,11.075 33.6,10.95 34.475,10.95 34.5,10.925 34.525,10.925 34.675,10.775 35.575,10.775 35.75,10.6 U3.F3@35.75,9.975
CLK-12M-FPGA: R25.2 U1.L17 | length 19.5
  Top Layer w0.076: U1.L17@20.975,11.875 21.15,11.85 21.4,11.85 21.5,11.9 22.775,13.175 23.425,13.175 v8(23.8,13.55) ; v1(27.525,17.75) 27.825,18.05 27.975,18.05 28.325,18.4 28.8,18.4 29.025,18.625 29.6,18.625 29.85,18.875 33.5,18.875 33.85,18.725 33.875,18.7 34.625,18.7 34.65,18.675 34.675,18.675 34.85,18.5 35.8,18.5 35.85,18.475 35.875,18.45 35.9,18.45 v4(36.125,18.4)
  L3-SIG w0.076: v4(36.125,18.4) v4(36.35,17.45)
  L4-SIG w0.076: v3(25.45,15.35) 25.81,15.71 ; 25.8,15.7 25.85,15.8 26.225,16.175 26.3,16.2 ; 26.29,16.19 27.525,17.425 v1(27.525,17.75)
  Bottom Layer w0.076: v8(23.8,13.55) 25.45,15.2 v3(25.45,15.35)
  other v2: 25.45,15.35
  other v4: 27.525,17.75
  other v5: 36.35,17.45 27.525,17.75 36.125,18.4
CLK-12M-FT: R24.2 U2.2 | length 7.5
  Top Layer w0.076: U2.2@9.55,10.55 9.7,10.425 9.775,10.35 9.775,8.8 9.875,8.7 9.875,8.175 v8(10.975,6.3)
  Bottom Layer w0.076: v8(10.975,6.3) 11.025,6.1 11.025,4.8 11,4.775 11,4.375 11.075,4.3 11.275,4.3 11.3,4.275 11.325,4.275 11.35,4.25 11.475,4.25 11.575,4.15 R24.2@11.75,4.075
CLK-12M-SHARED: Q1.3 R24.1 R25.1 | length 37.2
  Top Layer w0.076: v4(16.825,12.65) Q1.3@16.85,12.65 ; Q1.3@17.775,13.75 18.2,14.6 19.775,16.175 19.425,16.55 19.2,16.775 19.2,17.175 19.275,17.25 19.625,17.25 20.025,17.65 20.025,17.75 20.05,17.775 20.05,17.8 20.075,17.825 20.075,18.475 20.1,18.5 20.1,18.525 20.225,18.65 20.25,18.65 20.275,18.675 23.575,18.675 v4(23.7,18.8) ; v4(31.525,19.625) v4(33.15,19.55) ; v4(34.45,18.25) 34.55,18.15 35.7,18.15 35.875,17.975 R25.1@35.875,17.575
  L3-SIG w0.076: v1(10.475,6.625) v1(12.2,8.35) ; v1(14.425,10.65) 15.375,12.65 v4(16.825,12.65) ; v4(23.7,18.8) 23.95,18.675 ; 23.941,18.675 24.25,18.675 24.825,19.25 25.35,19.25 26.025,19.925 27.475,19.925 27.55,19.85 28.7,19.85 31.4,19.75 v4(31.525,19.625) ; v4(33.15,19.55) v4(34.45,18.25)
  L4-SIG w0.076: v1(10.475,6.625) 10.475,6.375 11.05,5.8 11.075,5.8 11.15,5.725 11.175,5.725 11.25,5.65 11.275,5.65 11.35,5.575 11.375,5.575 11.45,5.5 11.475,5.5 11.55,5.425 11.575,5.425 11.65,5.35 11.675,5.35 11.725,5.3 11.75,5.3 11.8,5.25 12,5.25 12.15,5.1 12.15,4.85 11.375,4.075 v3(11.35,3.95) ; v1(12.2,8.35) v1(14.425,10.65)
  other v2: 11.35,3.95
  other v5: 16.825,12.65 34.45,18.25 23.7,18.8 33.15,19.55 31.525,19.625
D0: U1.V2 U3.A8 | length 3.8
  Top Layer w0.076: v4(31.275,14.175) U3.A8@31.65,13.875
  L3-SIG w0.1: v7@28.4,15.425 28.55,15.35 28.75,15.15 28.8,15.125 v1(30.125,15.15) ; v1(30.725,14.55) v4(31.275,14.175)
  L4-SIG w0.1: v1(30.125,15.15) v1(30.725,14.55)
  other v5: 31.275,14.175
  other v6: 28.4,15.43
  other v7: 28.4,15.43
D1: U1.U1 U3.B9 | length 4.4
  Top Layer w0.076: U1.U1@28.95,15 v6(29.4,15.45) ; U3.B9@32.55,14.775 v4(32.55,15.15)
  L3-SIG w0.1: v6(29.4,15.45) 30.05,15.475 30.517,15.486 ; 30.525,15.475 30.675,15.4 31.25,15.4 31.3,15.425 31.325,15.45 31.35,15.45 31.4,15.475 31.6,15.5 ; 31.59,15.511 32.2,15.525 32.225,15.5 32.25,15.5 32.425,15.325 32.425,15.3 32.45,15.275 v4(32.55,15.15)
  other v5: 32.55,15.15
  other v7: 29.4,15.45
D2: U1.U4 U3.B8 | length 8.6
  Top Layer w0.076: U1.U4@27.475,14.975 27.65,15.05 27.775,15.175 28,15.175 28.15,15.325 28.15,15.55 28.275,15.675 29.025,15.675 v4(29.825,16.05) ; U3.B8@32.65,13.975 32.925,14.35 32.925,15.125 v4(32.975,15.175)
  L3-SIG w0.1: v4(29.825,16.05) 30.203,16.05 ; 30.2,16.05 v1(30.4,16.05) ; v4(32.975,15.175) 33.25,15.5 ; 33.259,15.504 v1(33.45,15.725)
  L4-SIG w0.1: v1(30.4,16.05) 30.625,15.9 30.825,15.9 30.975,15.925 ; 30.965,15.936 31.05,15.925 31.225,15.9 31.425,15.875 31.6,15.85 31.8,15.825 31.975,15.8 32.175,15.775 32.25,15.75 v1(33.45,15.725)
  other v5: 32.975,15.175 29.825,16.05
D3: U1.W2 U3.C9 | length 6.9
  Top Layer w0.076: U1.W2@28.475,15.975 28.65,16.05 28.775,16.175 28.925,16.175 28.95,16.2 29.399,16.337 ; 29.4,16.325 29.95,16.325 29.975,16.3 ; 29.97,16.305 30,16.275 30.025,16.275 30.1,16.25 v1(30.775,16.225) ; U3.C9@33.45,14.775 33.45,15.1 v4(33.725,15.175)
  L3-SIG w0.1: 33.625,15.475 33.625,15.45 v4(33.725,15.175) ; 33.629,15.479 33.725,15.575 33.725,15.6 33.75,15.625 v1(33.85,15.75)
  L4-SIG w0.1: v1(30.775,16.225) v1@30.8,16.225 ; v1@30.795,16.23 30.825,16.2 31,16.175 31.2,16.15 31.375,16.125 31.575,16.1 31.75,16.075 33.5,16.05 33.55,16.025 33.6,16 v1(33.85,15.75)
  other v4: 30.775,16.225
  other v5: 33.725,15.175 30.775,16.225
D4: U1.U5 U3.C8 | length 7.5
  L3-SIG w0.1: v1(32.175,14.525) 33.175,13.925 v4(33.4,13.875)
  L4-SIG w0.1: v1@26.9,14.925 27.05,15 27.25,15.2 27.275,15.2 27.3,15.225 27.35,15.25 27.7,15.25 27.721,15.229 ; 27.725,15.225 27.775,15.25 27.8,15.25 27.9,15.35 27.925,15.35 27.95,15.375 27.975,15.375 28,15.4 28.3,15.4 28.675,15.125 ; 28.68,15.125 29,15.125 29.05,15.15 29.375,15.475 30.175,15.475 30.2,15.45 30.225,15.45 30.25,15.425 30.275,15.425 30.9,14.8 31.875,14.8 31.9,14.775 31.925,14.775 v1(32.175,14.525)
  other v1: 26.9,14.93
  other v5: 33.4,13.875
  other v6: 26.9,14.93
  other v7: 26.9,14.93
D5: U1.W3 U3.D9 | length 11.6
  Top Layer w0.076: U1.W3@27.95,16 28.1,16.15 28.1,16.175 28.125,16.2 28.15,16.25 28.275,16.55 ; 28.271,16.55 28.475,16.55 v4(28.925,16.525) ; v4(33.025,13.275) 33.25,13.5 33.5,13.5 33.55,13.525 33.575,13.55 33.6,13.55 33.675,13.625 33.675,13.65 33.725,13.7 33.725,14.025 U3.D9@34.175,14.475
  L3-SIG w0.1: v4(28.925,16.525) 29.025,16.65 ; v5@29.019,16.641 29.375,16.7 29.4,16.7 29.425,16.725 29.625,16.725 29.65,16.7 29.675,16.7 30,16.375 30.307,16.375 ; 30.3,16.375 30.525,16.475 30.55,16.5 30.625,16.525 30.65,16.525 30.675,16.55 30.875,16.55 30.9,16.525 30.925,16.525 v1@31.075,16.375 ; v1@31.025,16.425 31.075,16.475 v1(31.075,16.5)
  L4-SIG w0.1: v1(31.075,16.5) 31.425,16.475 31.45,16.475 31.475,16.45 32.2,16.375 v3(33.5,16.375) ; v4(33.025,13.275) v3(33.5,13.55)
  Bottom Layer w0.1: v3(33.5,13.55) v3(33.5,16.375)
  other v1: 33.025,13.275
  other v2: 33.5,13.55 33.5,16.375
  other v5: 33.025,13.275 28.925,16.525
D6: U1.V3 U3.D8 | length 25.8
  Top Layer w0.076: v6@27.099,15.675 27.525,15.675 27.65,15.55 U1.V3@27.825,15.475 ; v6@27.15,15.675 v6(27.15,15.7) ; v4(29.125,17.075) 29.45,17.075 ; 29.45,17.012 v6(29.45,18.025) ; v6(33.8,13.175) U3.D8@34.175,13.675
  L3-SIG w0.1: v6(27.15,15.7) 26.65,16.225 26.725,16.5 26.75,16.525 26.75,16.55 26.925,16.725 26.95,16.725 26.975,16.75 27.225,16.75 27.625,17.15 27.65,17.15 27.675,17.175 27.875,17.175 27.9,17.15 27.925,17.15 28.15,16.925 28.275,16.925 v4(29.125,17.075) ; v6(29.45,18.025) 29.6,18.075 29.625,18.075 29.65,18.1 29.675,18.1 29.7,18.125 v1(29.9,18.2) ; v6(33.8,13.175) 34.25,13.15 34.275,13.15 34.375,13.05 34.4,13.05 34.425,13.025 34.675,13.025 34.825,13.175 34.85,13.175 34.875,13.2 35.65,13.325 ; 35.663,13.33 v1(35.75,13.1)
  L4-SIG w0.1: v1(29.9,18.2) v9(32.525,19.525) ; v1(35.75,13.1) v3(36.15,12.7)
  Bottom Layer w0.1: v9(32.525,19.525) 32.7,19.425 32.8,19.4 32.925,19.375 33.025,19.35 33.125,19.325 33.25,19.3 33.35,19.275 33.45,19.25 33.575,19.225 34.175,19.2 34.225,19.175 36.775,18.8 36.8,18.775 36.825,18.775 36.875,18.725 36.875,18.7 36.9,18.675 36.9,17.025 38.2,15.725 38.225,15.725 38.375,15.575 38.375,15.55 38.4,15.525 38.4,15.325 38.375,15.3 38.375,15.275 38.2,15.1 37.975,15.1 37.95,15.125 37.925,15.125 37.8,15.25 37.575,15.25 37.55,15.225 37.525,15.225 37.375,15.075 37.4,13.975 37.4,13.775 37.375,13.75 37.375,13.725 36.9,13.25 36.9,12.925 36.875,12.875 36.7,12.7 v3(36.15,12.7)
  other v2: 36.15,12.7
  other v5: 29.125,17.075
  other v7: 33.8,13.175 27.15,15.7 29.45,18.025
  other v10: 32.525,19.525
D7: U1.U7 U3.E9 | length 9.8
  Top Layer w0.076: v4(34.45,15) U3.E9@34.85,14.675
  L3-SIG w0.1: v1(33.25,14.275) 33.5,14.45 33.525,14.45 33.575,14.5 33.6,14.5 33.625,14.525 33.65,14.525 33.675,14.55 33.85,14.6 34.125,14.875 34.15,14.875 34.175,14.9 v4(34.45,15)
  L4-SIG w0.1: v1@25.9,14.925 26.5,14.625 27.5,14.625 27.55,14.65 27.65,14.75 27.95,14.75 28,14.725 28.025,14.7 28.05,14.7 29.125,14.625 29.6,14.15 31.875,14.15 31.9,14.175 31.925,14.175 v1@33.293,14.343 ; v1(33.25,14.275) v1@33.25,14.325
  other v1: 25.9,14.93
  other v5: 34.45,15
  other v6: 25.9,14.93
  other v7: 25.9,14.93
D8: U1.L1 U3.E1 | length 8.1
  Top Layer w0.076: U1.L1@28.975,11.875 29,11.875 29.025,11.85 29.075,11.85 29.1,11.825 29.125,11.825 29.175,11.775 29.2,11.775 29.301,11.729 ; 29.3,11.725 29.65,11.375 29.75,11.35 29.775,11.35 29.8,11.325 30.2,11.325 30.225,11.3 30.4,11.225 ; 30.396,11.231 30.575,11.15 30.6,11.125 32.225,11.125 32.25,11.1 32.275,11.1 32.3,11.075 32.325,11.075 32.625,10.775 33.275,10.775 33.9,10.15 34.325,10.15 34.35,10.125 34.375,10.125 34.5,10 34.5,9.975 34.525,9.95 34.525,8.8 U3.E1@34.95,8.375
D9: U1.K3 U3.D2 | length 7.5
  Top Layer w0.076: U1.K3@27.975,11.475 28.15,11.55 28.275,11.675 29.025,11.675 29.7,11 29.725,11 29.75,10.975 29.775,10.975 29.8,10.95 32.175,10.95 32.225,10.925 33,10.15 33.525,10.15 33.55,10.125 33.575,10.125 33.7,10 33.725,9.95 33.725,9.6 U3.D2@34.15,9.175
D10: U1.K2 U3.D1 | length 7.2
  Top Layer w0.076: U1.K2@28.475,11.375 28.675,11.275 28.7,11.275 28.8,11.175 29.025,11.175 29.125,11.075 29.775,10.775 32.125,10.775 32.9,10 32.9,9.975 32.925,9.95 32.925,9.825 33,9.75 33,9.65 33.3,9.35 33.525,9.35 33.55,9.325 33.575,9.325 33.7,9.2 33.725,9.15 33.725,8.8 U3.D1@34.15,8.375
D11: U1.J1 U3.C2 | length 5
  Top Layer w0.076: U1.J1@28.975,10.875 30.55,10.15 31.925,10.15 31.95,10.125 31.975,10.125 32.1,10 32.1,9.975 32.125,9.95 32.125,9.725 32.45,9.4 32.9,9.4 U3.C2@33.25,9.075
D12: U1.J3 U3.C1 | length 6
  Top Layer w0.076: v4(33.175,8.35) U3.C1@33.25,8.275
  L3-SIG w0.1: v1(28.775,10.5) 31.775,9.425 31.8,9.4 31.825,9.4 32.35,8.875 v4(33.175,8.35)
  L4-SIG w0.1: v1@27.9,10.925 v1(28.775,10.5)
  other v1: 27.9,10.93
  other v5: 33.175,8.35
  other v6: 27.9,10.93
  other v7: 27.9,10.93
D13: U1.H1 U3.B2 | length 3.9
  Top Layer w0.076: U1.H1@28.975,10.375 29,10.375 29.025,10.35 29.075,10.35 29.1,10.325 29.125,10.325 29.175,10.275 29.2,10.275 30.575,9.375 32.075,9.375 U3.B2@32.45,9.075
D14: U1.A14 U3.B1 | length 10.7
  Top Layer w0.076: U1.A14@22.475,6.875 22.675,6.775 22.7,6.775 22.8,6.675 29,6.675 30.2,7.875 30.425,7.875 30.6,8.05 v6(30.8,8.275) ; v4(32.375,8.3) U3.B1@32.45,8.275
  L3-SIG w0.1: v6(30.8,8.275) v4(32.375,8.3)
  other v5: 32.375,8.3
  other v7: 30.8,8.275
D15: U1.A15 U3.A2 | length 11
  Top Layer w0.076: U1.A15@21.975,6.875 22.175,6.775 22.2,6.775 22.3,6.675 22.425,6.675 22.45,6.65 22.625,6.575 22.65,6.575 22.7,6.525 22.75,6.5 22.825,6.5 22.85,6.475 v8(27.75,6.2)
  L3-SIG w0.1: v8(29.775,8.225) 30.325,8.775 31.35,8.775 31.375,8.8 31.4,8.8 31.55,8.95 v4(31.675,9.1)
  Bottom Layer w0.1: v8(27.75,6.2) v8(29.775,8.225)
  other v5: 31.675,9.1
DONE: R4.2 U2.22 | length 4.6
  Top Layer w0.076: v8(10.03,6.32) 11.7,4.975 12.225,3.4 U2.22@12.35,3.25
  Bottom Layer w0.076: R4.2@10,6.95 v8(10.03,6.32)
DONE-PU: R4.9 R4.10 | length 0.5
  Bottom Layer w0.076: R4.10@14.05,5.25 R4.9@14.525,5.25
EE-CLK: R96.1 U2.62 U10.2 | length 9.1
  Top Layer w0.076: v4(8.675,14.425) 8.95,14.15 8.95,13.475 9.25,13.175 9.35,13.175 9.5,13.025 9.5,12.475 9.525,12.45 9.8,12.35 9.825,12.325 10.65,12.325 10.725,12.25 U2.62@10.85,12.1
  L3-SIG w0.076: v4(5.275,17.225) 7,16.45 7.025,16.425 7.375,16.425 7.7,16.1 8,15.8 8,15.1 v4(8.675,14.425) ; v4(9.5,12.95) v2(9.515,12.475)
  other v1: 9.515,12.475
  other v3: 9.515,12.475
  other v5: 9.5,12.95 8.675,14.425 5.275,17.225
EE-CS: R98.1 U2.63 U10.1 | length 9.6
  Top Layer w0.076: U10.1@4.775,17.225 4.875,17.025 4.875,17 v4(5.075,16.8) ; v4(8.675,13.725) v8(8.7,12.85)
  L3-SIG w0.076: v4(5.075,16.8) 5.525,15.55 5.55,15.525 5.55,15.15 5.625,15.075 7.125,15.075 8.4,13.8 v4(8.675,13.725) ; v8(8.7,12.85) 9.4,12.15 9.85,12.15 v4(10.35,11.65)
  Bottom Layer w0.076: R98.1@8.375,13.35 v8(8.7,12.85)
  other v5: 10.35,11.65 8.675,13.725 5.075,16.8
EE-DATA: R101.2 U2.61 U10.3 | length 18.6
  Top Layer w0.076: U10.3@5.775,17.3 v4(5.8,17.3) ; U2.61@11.55,11.525 v4(12.425,9.75)
  L3-SIG w0.076: v4(5.8,17.3) 7.95,17.3 9.2,16.475 9.225,16.45 9.25,16.45 v1(9.525,16.175) ; v4(11.55,12.025) 11.675,12.15 11.8,12.15 11.975,12.325 11.975,12.35 12.325,12.7 12.325,13.875 11.875,14.325 11.875,14.85 v1(11.775,15.475) ; v4(12.425,9.75) 15.425,5.925 v1(15.425,4.675)
  L4-SIG w0.076: v1(9.525,16.175) v1(11.775,15.475)
  other v2: 15.425,4.675
  other v3: 15.425,4.675
  other v5: 12.425,9.75 11.55,12.025 5.8,17.3
EE-DATA-DO: R97.1 R101.1 U10.4 | length 19.7
  L3-SIG w0.076: v6(6.2,17.575) 6.225,17.55 8.225,17.55 8.35,17.425 8.925,16.875 8.975,16.825 9,16.825 9.05,16.775 9.075,16.775 9.125,16.725 9.15,16.725 9.2,16.675 9.225,16.675 9.25,16.65 9.275,16.65 9.325,16.6 9.35,16.6 9.5,16.45 9.6,16.45 9.65,16.425 v1(10.275,16.225) ; v1(12.175,15.5) 12.6,14.375 12.6,10.325 12.15,9.875 12.15,9.625 12.8,8.975 12.8,8.95 v1(14.75,4.65)
  L4-SIG w0.076: v1(10.275,16.225) 10.475,16.075 10.5,16.05 10.55,16.05 10.575,16.025 10.625,16.025 10.65,16 10.725,16 10.75,15.975 10.8,15.975 10.825,15.95 10.875,15.95 10.9,15.925 10.95,15.925 10.975,15.9 11.025,15.9 11.05,15.875 11.125,15.875 11.15,15.85 11.2,15.85 11.225,15.825 11.275,15.825 11.3,15.8 11.35,15.8 11.375,15.775 11.45,15.775 11.475,15.75 11.85,15.75 11.9,15.725 12.125,15.5 v1(12.175,15.5)
  Bottom Layer w0.076: R101.1@14.975,4.475 15.1,4.475 15.275,4.3 15.675,4.3 15.775,4.4 R97.1@15.95,4.475
  other v2: 14.75,4.65
  other v3: 14.75,4.65
  other v7: 6.2,17.575